# Altium PCB MONO65_A2.PcbDoc (part 2 of 4)
Units mm, origin at the board's own origin, x right, y up, seen from the top; angles counter-clockwise.
Board outline 304.6 x 95.05 mm, 2 copper layers (Component Side, Solder Side), stack 1.586 mm thick; 275 components, 185 nets, 1029 pads, 156 vias.
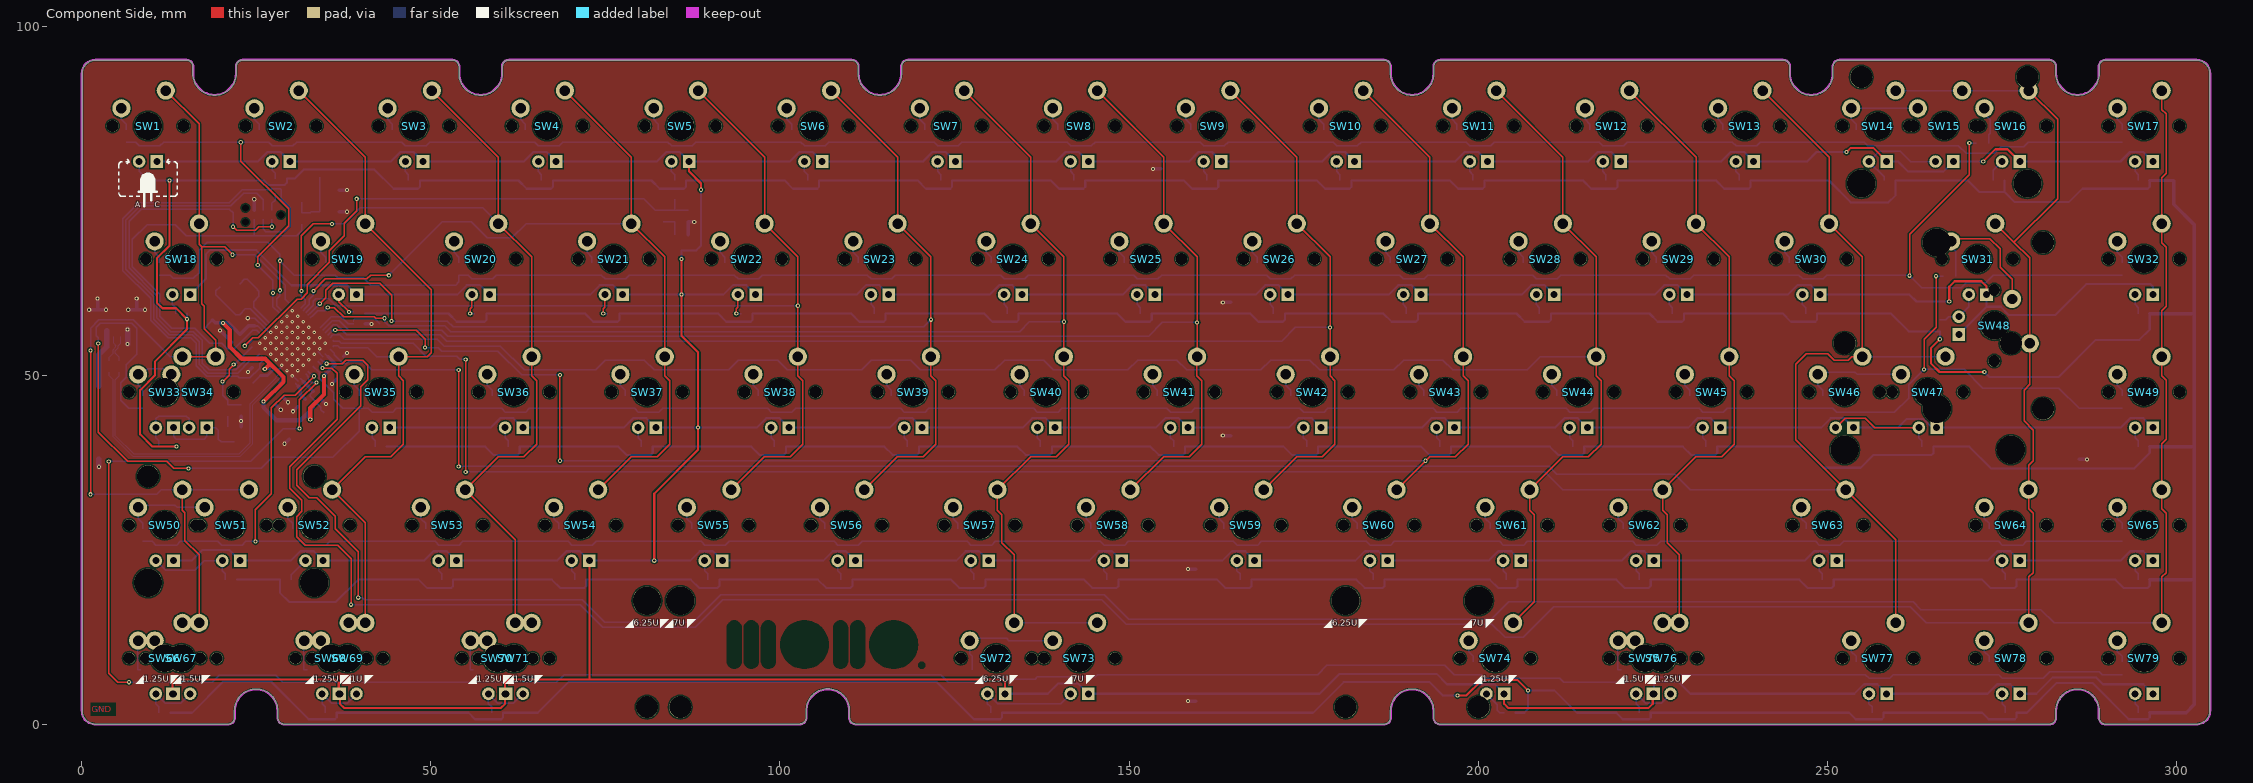
[diagram p0: Component Side view]

## Part data (continued)
R1 R2: library part "RES SMD 22R 1% 0603", "SMD RESISTOR 22R 1% 0603 0.1W", Case/Package=0603, Case Code (Metric)=1608, Manufacturer=Yageo, Manufacturer Part Number=RC0603FR-0722RL, Max Operating Temperature=155°C, Max Power Dissipation=100mW, Min Operating Temperature=-55°C, Package Quantity=1, Resistance=22R, Resistance Tolerance=1%, Resistor Type="Thick Film", Supplier Part Number 1=311-22.0HRCT-ND, Temperature Coefficient=100ppm/°C, Voltage Rating=50V, Case Code (Imperial)=0603, ComponentLink1Description=https://datasheet.ciiva.com/11819/0900766b80f96399-11819285.pdf?src-supplier=RSComponents, ComponentLink1URL=https://datasheet.ciiva.com/11819/0900766b80f96399-11819285.pdf?src-supplier=RSComponents, ComponentLink2Description=https://datasheet.ciiva.com/2454/pyu-r-int-thick-7-2454354.pdf?src-supplier=Digi-Key, ComponentLink2URL=https://datasheet.ciiva.com/2454/pyu-r-int-thick-7-2454354.pdf?src-supplier=Digi-Key, ComponentLink3Description=https://datasheet.ciiva.com/2454/pyu-r-int-thick-7-2454355.pdf?src-supplier=Digi-Key, ComponentLink3URL=https://datasheet.ciiva.com/2454/pyu-r-int-thick-7-2454355.pdf?src-supplier=Digi-Key, ComponentLink4Description=https://datasheet.ciiva.com/2454/pyu-r-int-thick-7-2454356.pdf?src-supplier=Digi-Key, ComponentLink4URL=https://datasheet.ciiva.com/2454/pyu-r-int-thick-7-2454356.pdf?src-supplier=Digi-Key, ComponentLink5Description=https://datasheet.ciiva.com/46440/1868787-46440901.pdf?src-supplier=Element14, ComponentLink5URL=https://datasheet.ciiva.com/46440/1868787-46440901.pdf?src-supplier=Element14, ComponentLink6Description=https://datasheet.ciiva.com/46395/443971-46395032.pdf?src-supplier=Element14, ComponentLink6URL=https://datasheet.ciiva.com/46395/443971-46395032.pdf?src-supplier=Element14, Construction=Rectangular, Depth=0.8mm, Features="Moisture Resistant", Height=0.022inch, Lead Free="Lead Free", Length=1.6mm, Military Standard=Not, Number of Pins=2, Number of Terminations=2, Packaging="Tape and Reel", Power Rating=100mW, Pricing 1="1 = 0,10000, 10 = 0,02400, 100 = 0,00970, 1000 = 0,00436, 2500 = 0,00378 (USD)", REACH SVHC="No SVHC", RoHS=Yes, RoHS Compliant=Yes, Series=RC, Size Code=0603, Stock 1=829965, Supplier 1=Digi-Key, Technology="THICK FILM", Termination=SMD/SMT, Tolerance=1%, Voltage Rating (DC)=50V, Width=0.031inch
R3 R5 R6 R7 R8 R10 R94: library part "RES SMD 0R 1% 0603", "SMD RESISTOR 0R 1% 0603 0.1W", Case/Package=0603, Case Code (Metric)=1608, Manufacturer=Yageo, Manufacturer Part Number=RC0603JR-070RL, Max Operating Temperature=155°C, Min Operating Temperature=-55°C, Package Quantity=5000, Power Rating=100mW, Resistance=0mR, Supplier Part Number 1=311-0.0GRDKR-ND, Temperature Coefficient=200ppm/°C, Tolerance=1%, Voltage Rating=50V, Case Code (Imperial)=0603, ComponentLink1Description=https://datasheet.ciiva.com/11808/pyu-r-int-6-11808700.pdf?src-supplier=RSComponents, ComponentLink1URL=https://datasheet.ciiva.com/11808/pyu-r-int-6-11808700.pdf?src-supplier=RSComponents, ComponentLink2Description=https://datasheet.ciiva.com/7746/1738695-7746421.pdf?src-supplier=Element14, ComponentLink2URL=https://datasheet.ciiva.com/7746/1738695-7746421.pdf?src-supplier=Element14, ComponentLink3Description=https://datasheet.ciiva.com/8883/pyu-rc0603-51-rohs-l-4-8883045.pdf?src-supplier=Avnet, ComponentLink3URL=https://datasheet.ciiva.com/8883/pyu-rc0603-51-rohs-l-4-8883045.pdf?src-supplier=Avnet, ComponentLink4Description=https://datasheet.ciiva.com/15189/getdatasheetpartid-329462-15189845.pdf?src-supplier=Verical, ComponentLink4URL=https://datasheet.ciiva.com/15189/getdatasheetpartid-329462-15189845.pdf?src-supplier=Verical, ComponentLink5Description=https://datasheet.ciiva.com/7746/1738695-7746422.pdf?src-supplier=Element14, ComponentLink5URL=https://datasheet.ciiva.com/7746/1738695-7746422.pdf?src-supplier=Element14, ComponentLink6Description=https://datasheet.ciiva.com/12555/rc0603-272842-12555254.pdf?src-supplier=Mouser, ComponentLink6URL=https://datasheet.ciiva.com/12555/rc0603-272842-12555254.pdf?src-supplier=Mouser, ComponentLink7Description=https://datasheet.ciiva.com/22747/443971-22747530.pdf?src-supplier=Element14, ComponentLink7URL=https://datasheet.ciiva.com/22747/443971-22747530.pdf?src-supplier=Element14, Composition="Thick Film", Contact Plating=Tin,Matte, Depth=0.8mm, Height=0.45mm, Lead Free="Lead Free", Length=1.6mm, Military Standard=Not, Number of Pins=2, Packaging="Tape and Reel", Pricing 1="1 = 0,10000, 10 = 0,01900, 25 = 0,01360, 50 = 0,01040, 100 = 0,00770, 250 = 0,00588, 500 = 0,00472, 1000 = 0,00347 (USD)", Radiation Hardening=No, REACH SVHC="No SVHC", RoHS=Yes, Stock 1=22182575, Supplier 1=Digi-Key, Termination=SMD/SMT, Voltage Rating (DC)=50V, Width=0.8mm
R4 R9 R14 R16: library part "RES SMD 10k 1% 0603", "SMD RESISTOR 10k 1% 0603 0.1W", Case/Package=0603, Case Code (Metric)=1608, Manufacturer=Panasonic, Manufacturer Part Number=ERJ-3EKF1002V, Max Operating Temperature=155°C, Max Power Dissipation=100mW, Min Operating Temperature=-55°C, Package Quantity=1, Resistance=10kR, Supplier Part Number 1=P10.0KHDKR-ND, Temperature Coefficient=100ppm/°C, Tolerance=1%, Voltage Rating=75V, Case Code (Imperial)=0603, ComponentLink1Description=https://datasheet.ciiva.com/7830/aoa0000ce2-7830729.pdf?src-supplier=Element14, ComponentLink1URL=https://datasheet.ciiva.com/7830/aoa0000ce2-7830729.pdf?src-supplier=Element14, ComponentLink2Description=https://datasheet.ciiva.com/17212/aoa0000ce2-17212105.pdf?src-supplier=Avnet+Europe, ComponentLink2URL=https://datasheet.ciiva.com/17212/aoa0000ce2-17212105.pdf?src-supplier=Avnet+Europe, ComponentLink3Description=https://datasheet.ciiva.com/48530/aoa0000ce2-48530988.pdf?src-supplier=Avnet, ComponentLink3URL=https://datasheet.ciiva.com/48530/aoa0000ce2-48530988.pdf?src-supplier=Avnet, ComponentLink4Description=https://datasheet.ciiva.com/24070/aoa0000ce2-24070318.pdf?src-supplier=Mouser, ComponentLink4URL=https://datasheet.ciiva.com/24070/aoa0000ce2-24070318.pdf?src-supplier=Mouser, ComponentLink5Description=https://datasheet.ciiva.com/16759/70260748-16759807.pdf?src-supplier=Allied+Electronics, ComponentLink5URL=https://datasheet.ciiva.com/16759/70260748-16759807.pdf?src-supplier=Allied+Electronics, ComponentLink6Description=https://datasheet.ciiva.com/16511/aoa0000ce2-16511861.pdf?src-supplier=Avnet+Asia, ComponentLink6URL=https://datasheet.ciiva.com/16511/aoa0000ce2-16511861.pdf?src-supplier=Avnet+Asia, ComponentLink7Description=https://datasheet.ciiva.com/46372/1678782-46372725.pdf?src-supplier=Element14, ComponentLink7URL=https://datasheet.ciiva.com/46372/1678782-46372725.pdf?src-supplier=Element14, ComponentLink8Description=https://datasheet.ciiva.com/28514/426256-28514198.pdf?src-supplier=Element14, ComponentLink8URL=https://datasheet.ciiva.com/28514/426256-28514198.pdf?src-supplier=Element14, ComponentLink9Description=https://datasheet.ciiva.com/9194/aoa0000ce2-9194199.pdf?src-supplier=Avnet, ComponentLink9URL=https://datasheet.ciiva.com/9194/aoa0000ce2-9194199.pdf?src-supplier=Avnet, ComponentLink10Description=https://datasheet.ciiva.com/30208/aoa0000ce2-30208985.pdf?src-supplier=Onlinecomponents.com, ComponentLink10URL=https://datasheet.ciiva.com/30208/aoa0000ce2-30208985.pdf?src-supplier=Onlinecomponents.com, Composition="Thick Film", Contact Plating=Tin, Depth=0.8mm, Features="Automotive AEC-Q200", Height=0.45mm, Lead Free="Lead Free", Length=1.6mm, Military Standard=Not, Mount="Surface Mount", Number of Pins=2, Number of Terminations=2, Packaging="Tape and Reel", Power Rating=100mW, Pricing 1="1 = 0,10000, 10 = 0,06000, 100 = 0,02440, 1000 = 0,01094, 2500 = 0,00950 (USD)", Radiation Hardening=No, REACH SVHC="No SVHC", RoHS=Yes, Stock 1=1973326, Supplier 1=Digi-Key, Termination=SMD/SMT, Voltage Rating (DC)=75V, Width=0.031inch
R11 R13 R15 R17 R18 R19 R20 R21 R22 R23 R24 R25 R26 R27 R28 R29 R30 R32 R33 R34 R35 R36 R37 R38 R39 R40 R41 R42 R43 R44 R45 R46 R47 R48 R49 R50 R51 R52 R53 R54 R55 R56 R57 R58 R59 R61 R63 R64 R66 R67 R68 R69 R70 R71 R72 R73 R74 R75 R76 R77 R78 R79 R80 R82 R84 R86 R88 R89 R91 R92 R93: library part "RES SMD 470R 1% 0603", "SMD RESISTOR 470R 1% 0603 0.1W", Case/Package=0603, Case Code (Metric)=1608, Manufacturer=Yageo, Manufacturer Part Number=RC0603FR-07470RL, Max Operating Temperature=155°C, Max Power Dissipation=100mW, Min Operating Temperature=-55°C, Package Quantity=1, Resistance=470R, Resistance Tolerance=1%, Resistor Type="Thick Film", Supplier Part Number 1=311-470HRCT-ND, Temperature Coefficient=100ppm/°C, Voltage Rating=50V, Working Voltage=75V, Case Code (Imperial)=0603, ComponentLink1Description=https://datasheet.ciiva.com/11808/0900766b80f96399-11808177.pdf?src-supplier=RSComponents, ComponentLink1URL=https://datasheet.ciiva.com/11808/0900766b80f96399-11808177.pdf?src-supplier=RSComponents, ComponentLink2Description=https://datasheet.ciiva.com/7746/1738695-7746359.pdf?src-supplier=Element14, ComponentLink2URL=https://datasheet.ciiva.com/7746/1738695-7746359.pdf?src-supplier=Element14, ComponentLink3Description=https://datasheet.ciiva.com/7746/1738695-7746360.pdf?src-supplier=Element14, ComponentLink3URL=https://datasheet.ciiva.com/7746/1738695-7746360.pdf?src-supplier=Element14, ComponentLink4Description=https://datasheet.ciiva.com/7660/1868787-7660793.pdf?src-supplier=Element14, ComponentLink4URL=https://datasheet.ciiva.com/7660/1868787-7660793.pdf?src-supplier=Element14, ComponentLink5Description=https://datasheet.ciiva.com/46440/1868787-46440907.pdf?src-supplier=Element14, ComponentLink5URL=https://datasheet.ciiva.com/46440/1868787-46440907.pdf?src-supplier=Element14, ComponentLink6Description=https://datasheet.ciiva.com/2454/pyu-r-int-thick-7-2454012.pdf?src-supplier=Digi-Key, ComponentLink6URL=https://datasheet.ciiva.com/2454/pyu-r-int-thick-7-2454012.pdf?src-supplier=Digi-Key, ComponentLink7Description=https://datasheet.ciiva.com/2454/pyu-r-int-thick-7-2454013.pdf?src-supplier=Digi-Key, ComponentLink7URL=https://datasheet.ciiva.com/2454/pyu-r-int-thick-7-2454013.pdf?src-supplier=Digi-Key, ComponentLink8Description=https://datasheet.ciiva.com/2454/pyu-r-int-thick-7-2454014.pdf?src-supplier=Digi-Key, ComponentLink8URL=https://datasheet.ciiva.com/2454/pyu-r-int-thick-7-2454014.pdf?src-supplier=Digi-Key, Construction=Rectangular, Depth=0.8mm, Features="Moisture Resistant", Height=0.022inch, Lead Free="Lead Free", Length=1.6mm, Military Standard=Not, Number of Terminations=2, Packaging="Tape and Reel", Power Rating=100mW, Pricing 1="1 = 0,10000, 10 = 0,02300, 100 = 0,00930, 1000 = 0,00417, 2500 = 0,00362 (USD)", REACH SVHC="No SVHC", RoHS=Yes, RoHS Compliant=Yes, Series=RC, Stock 1=512962, Supplier 1=Digi-Key, Technology="THICK FILM", Termination=SMD/SMT, Tolerance=1%, Width=0.031inch
SW1 SW2 SW3 SW4 SW5 SW6 SW7 SW8 SW9 SW10 SW11 SW12 SW13 SW14 SW15 SW16 SW17 SW18 SW19 SW20 SW21 SW22 SW23 SW24 SW25 SW26 SW27 SW28 SW29 SW30 SW31 SW32 SW33 SW34 SW35 SW36 SW37 SW38 SW39 SW40 SW41 SW42 SW43 SW44 SW45 SW46 SW47 SW48 SW49 SW50 SW51 SW52 SW53 SW54 SW55 SW56 SW57 SW58 SW59 SW60 SW61 SW62 SW63 SW64 SW65 SW66 SW67 SW68 SW69 SW70 SW71 SW72 SW73 SW74 SW75 SW76 SW77 SW78 SW79: library part "SW MX1A-11GW", "Cherry MX switch, 1-pole w/LED, w/fixation pins, GREEN LED", Manufacturer=Cherry, Supplier Part Number 1=MX1A-11GW-ND, Manufacturer Part Number=MX1A-11GW, Pricing 1="8000 = 1,62196 (USD)", RoHS=No, Stock 1=0, Supplier 1=Digi-Key
SW80: library part "SWC 430173003816", "WS-TASV J-Bend SMT Tact Switch 3.7x3.7mm. 12 V (DC) 50mA. 500000 Cycles.", Manufacturer="Wurth Electronics", Manufacturer Part Number=430173003816, Supplier Part Number 1=710-430173003816, Pricing 1="1 = 0,51000, 10 = 0,48600, 50 = 0,42000, 100 = 0,42000, 1000 = 0,36800, 10000 = 0,36800 (USD)", RoHS=No, Stock 1=9733, Supplier 1=Mouser
TP1 TP2 TP3 TP4 TP5 TP6 TP7 TP8 TP9 TP10 TP11 TP12 TP18 TP19: library part "TPT SMD 60", "Test Point SMD 0.6mm"
XC1: library part "CYR SMD 16MHz MCSJK-7U-16.00-10-10-80-B-10", "Crystal Resonator, 16MHz, 10pF, 3.2mm X 2.5mm, SMD", Case/Package="SMD 3225", Manufacturer=Multicomp, Manufacturer Part Number=MCSJK-7U-16.00-10-10-80-B-10, Supplier Part Number 1=2853934, Pricing 1="5 = 0,21300, 50 = 0,17300, 250 = 0,15200, 500 = 0,13800 (EUR)", RoHS=No, Stock 1=69101, Supplier 1=Farnell

## Free pads (board coordinates)
  round 4.05 hole 4.05 unplated: STAB(9.531,20.335) STAB(33.331,20.335) STAB(80.963,17.765) STAB(85.725,17.765) STAB(180.975,17.765) STAB(200.025,17.765) STAB(252.419,39.385) STAB(254.8,77.485) STAB(265.604,45.25) STAB(265.604,69.05) STAB(276.219,39.385) STAB(278.6,77.485)
  round 3.15 hole 3.15 unplated: STAB(9.531,35.575) STAB(33.331,35.575) STAB(80.963,2.525) STAB(85.725,2.525) STAB(180.975,2.525) STAB(200.025,2.525) STAB(252.419,54.625) STAB(254.8,92.725) STAB(276.219,54.625) STAB(278.6,92.725) STAB(280.844,45.25) STAB(280.844,69.05)

## Via types
v1: diameter 0.6, hole 0.3, Component Side to Solder Side, tented both sides, 107 vias
v2: diameter 0.5, hole 0.2, Component Side to Solder Side, tented top, 49 vias

## Nets (pads, with @x,y where several pads share a name; then routed paths per layer and width w, separated by ;. In a path a pad name is that pad's centre, name@x,y a point inside that pad or via, vN(x,y) a via of type N, cw(c..) or ccw(c..) an arc to the next point about the centre after c; other vN are vias at no path point)
5V_IN: F1.1 K1.1 TP1.1 | length 8.3
  Solder Side w0.8: F1.1@2.5,48.5 TP1.1@2.5,51.3 2.5,53 3.6,54.1 K1.1@3.6,55.55 3.6,56.39